# Altium PCB Board3ph.PcbDoc (part 1 of 2)
Units mm, origin at the board's own origin, x right, y up, seen from the top; angles counter-clockwise.
Board outline 64.06 x 79.42 mm, 4 copper layers (Top Layer, Mid Layer, Mid Layer 2, Bottom Layer), stack 0.743 mm thick; 89 components, 80 nets, 350 pads, 102 vias.
Unrouted connection lines stored in the file: 3.
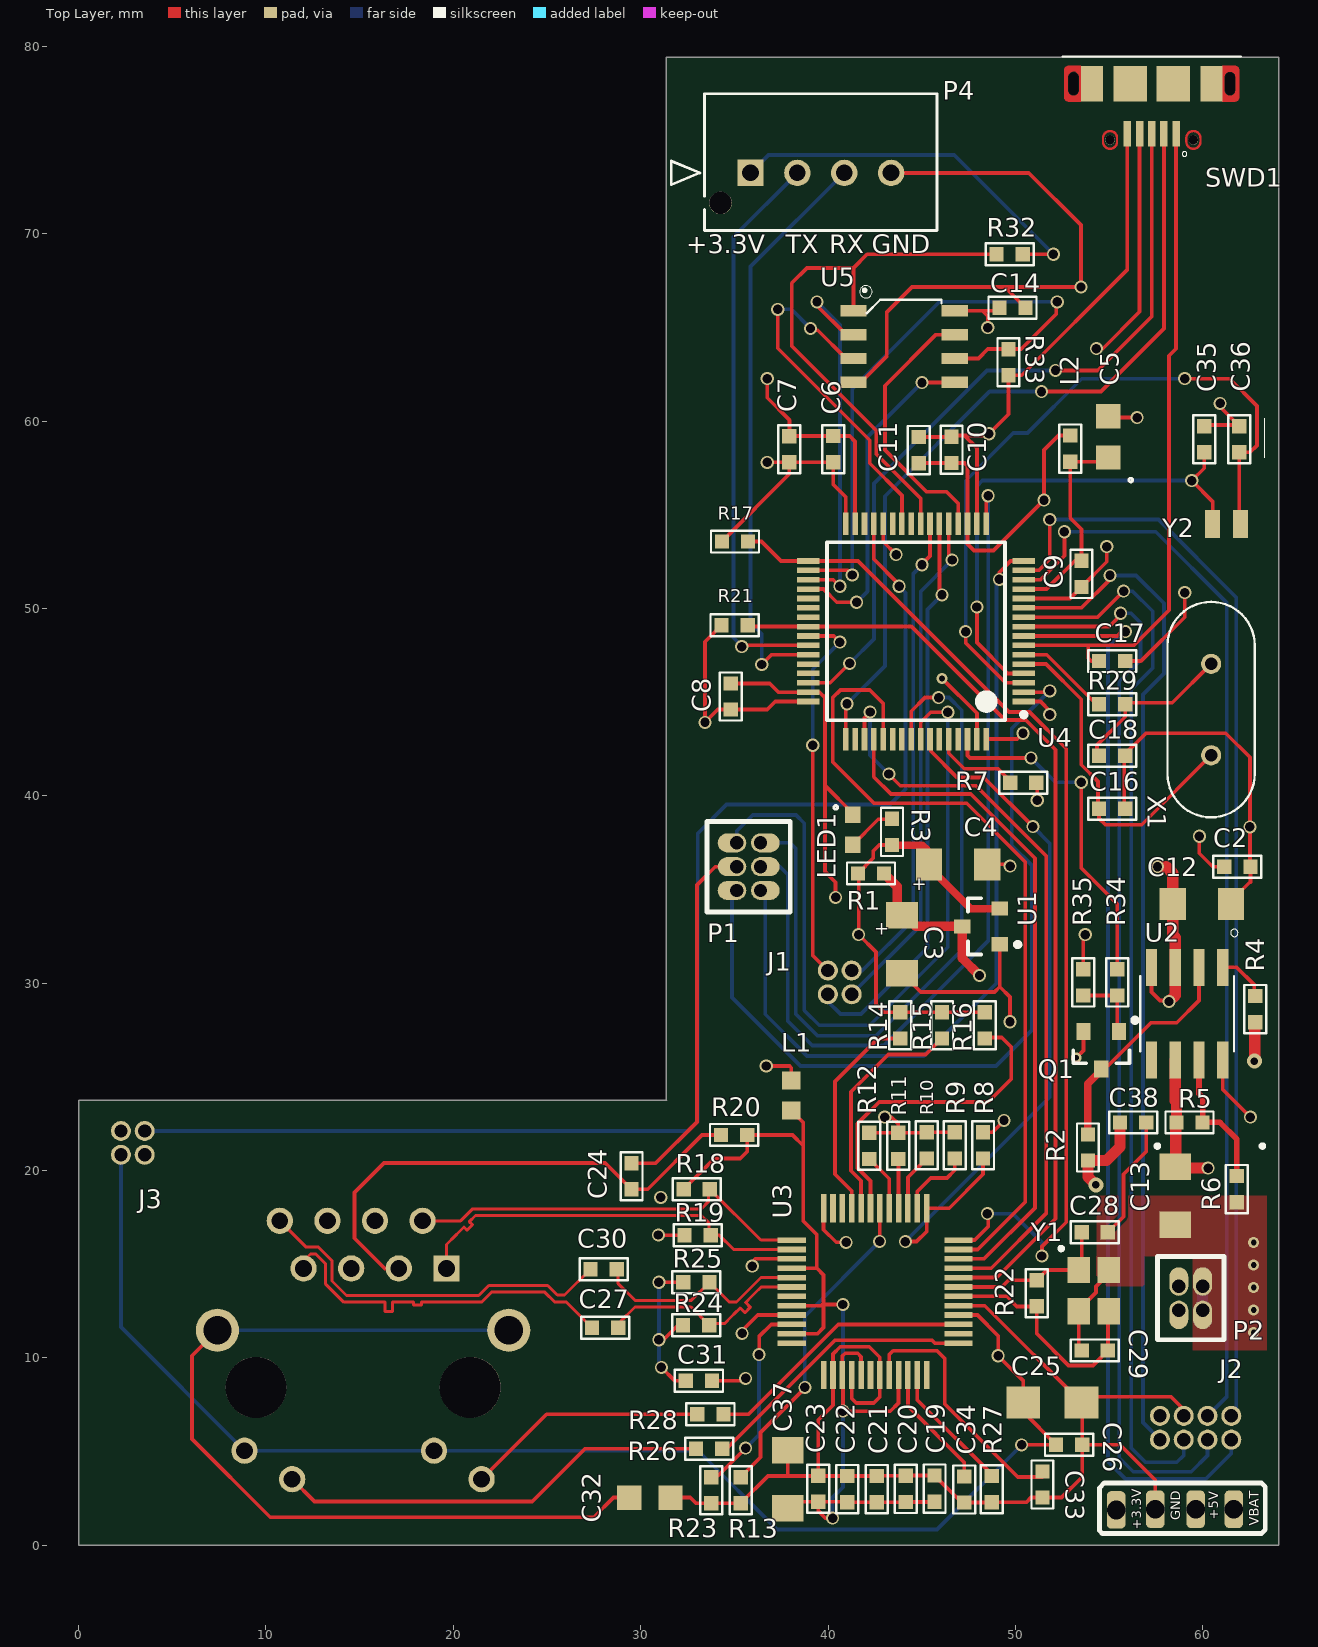
[diagram p0: Top Layer view]
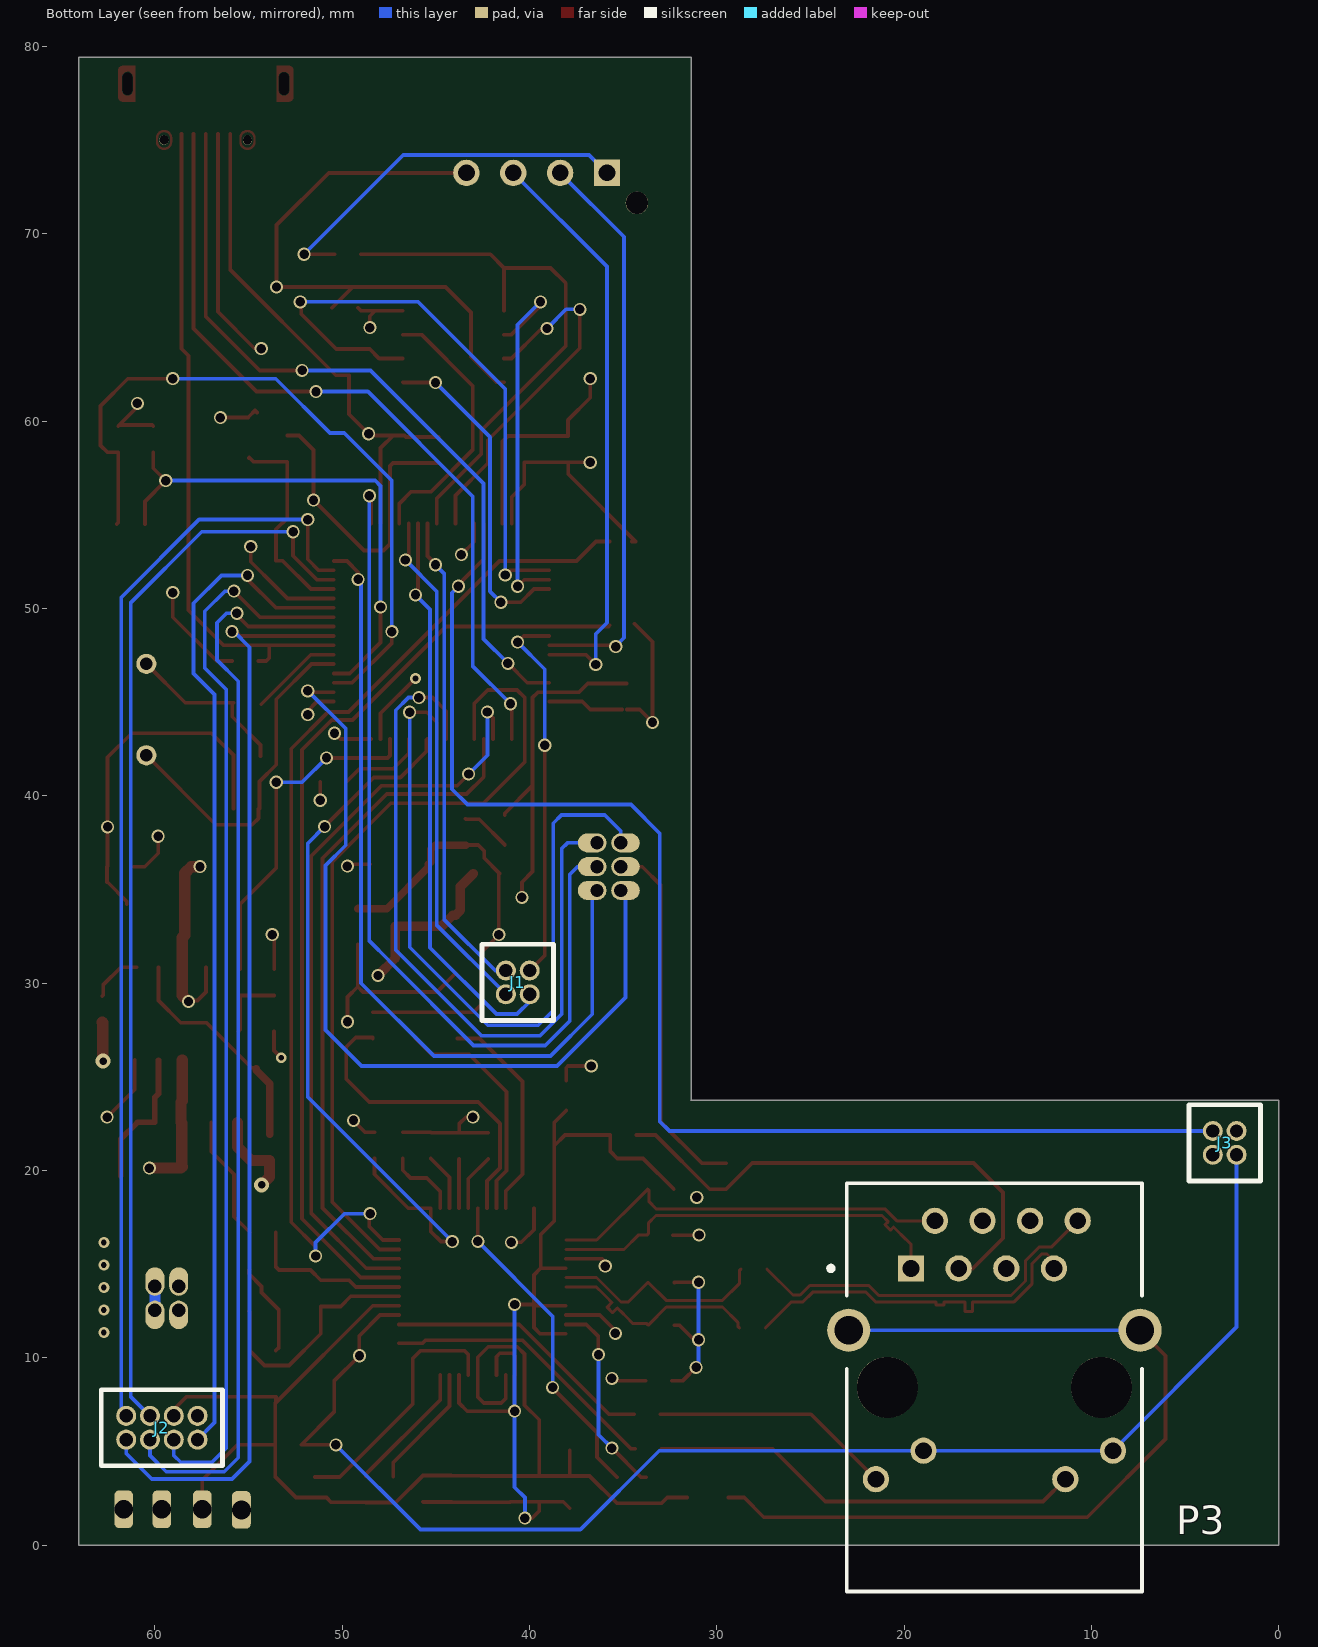
[diagram p1: Bottom Layer view, seen from below]
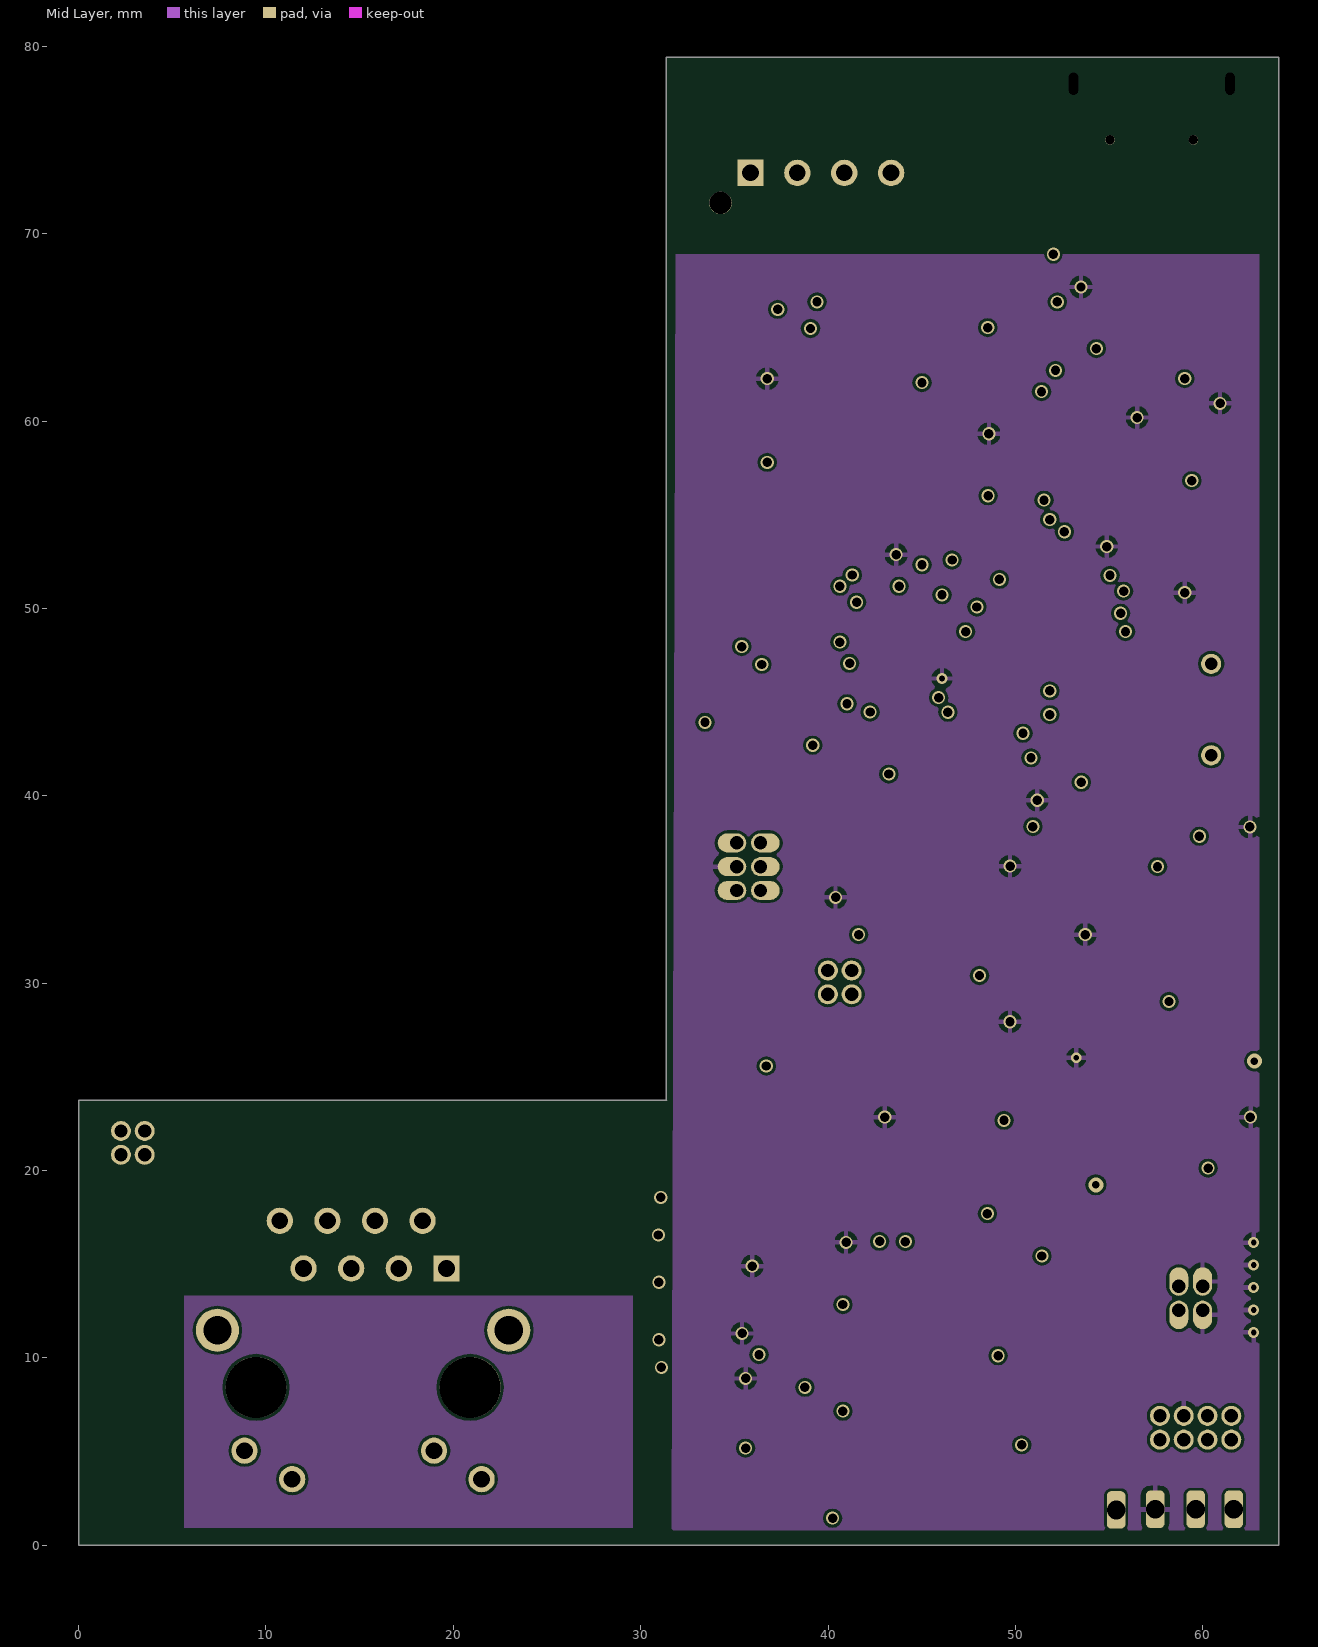
[diagram p2: Mid Layer]
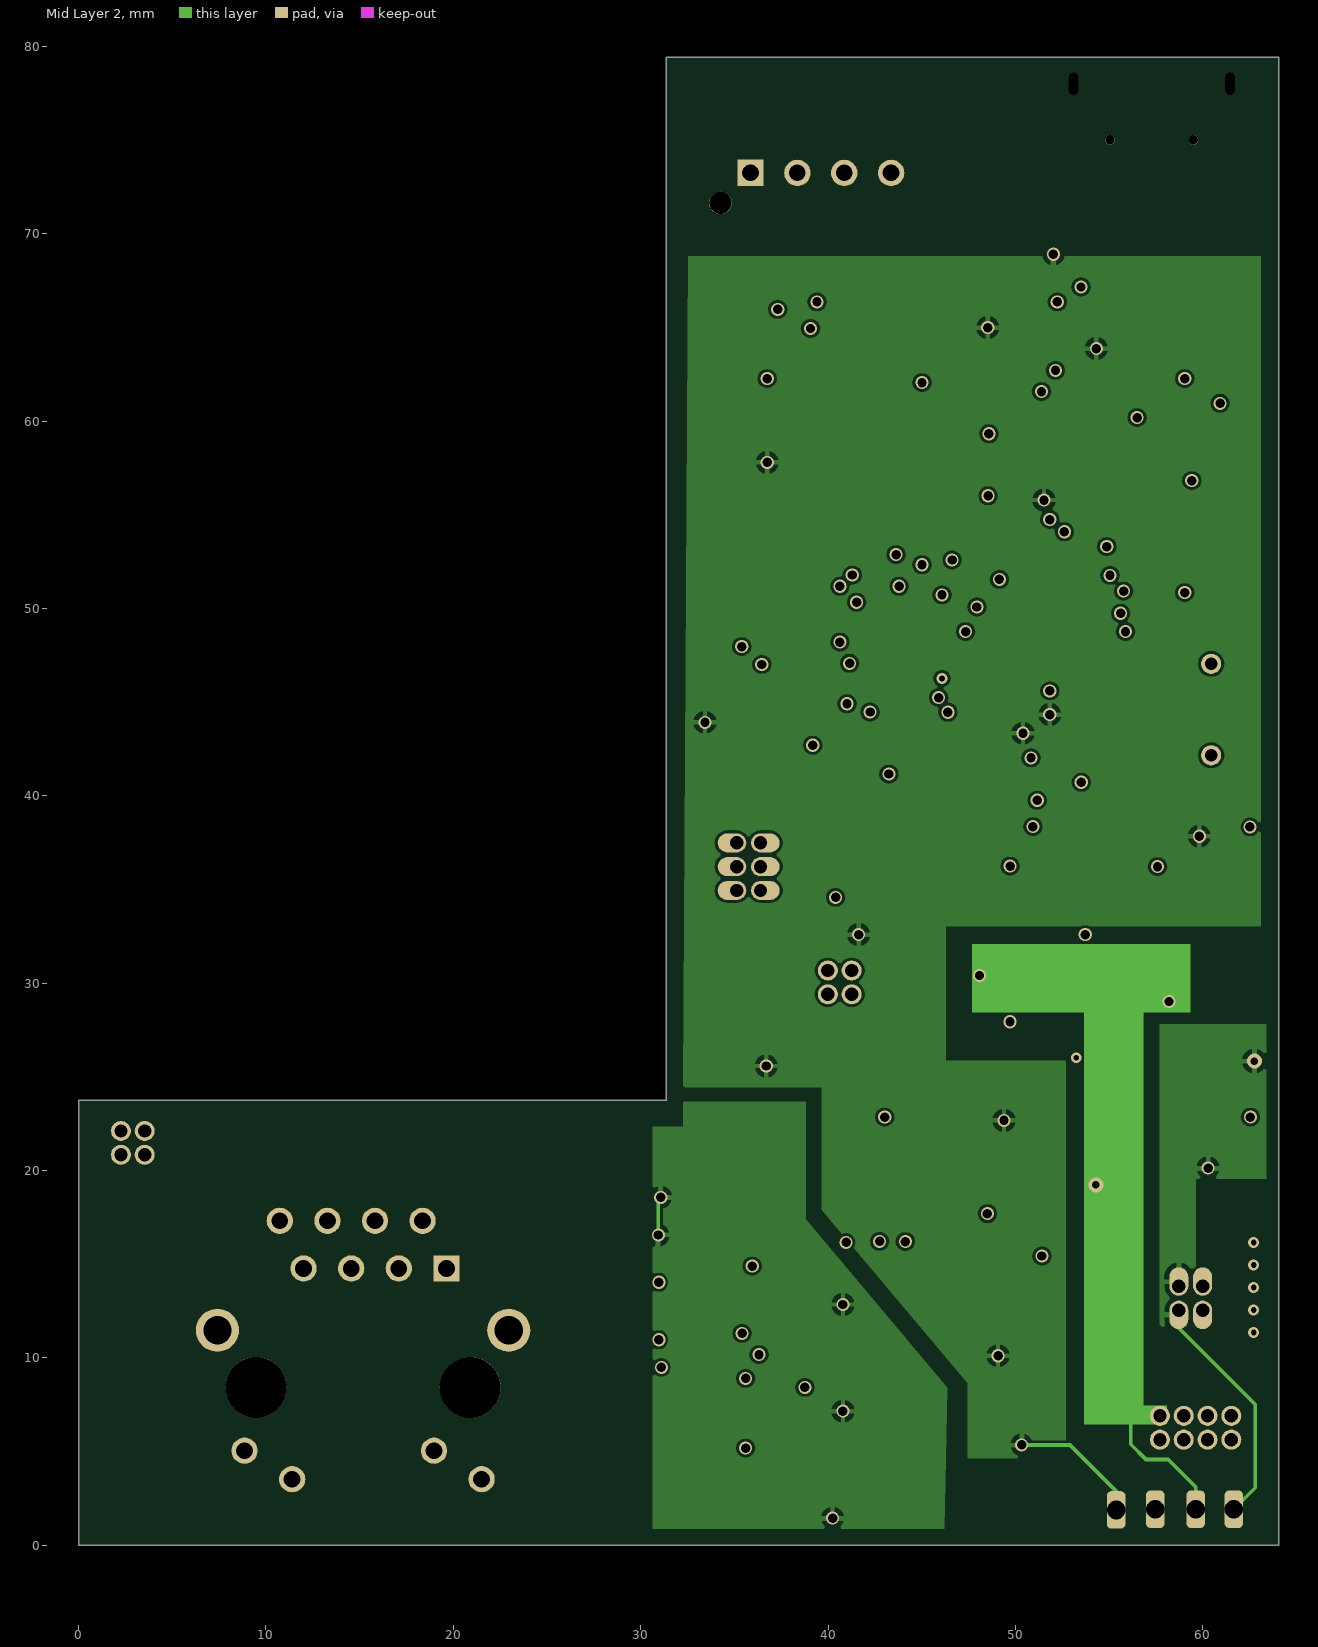
[diagram p3: Mid Layer 2]

## Layer stack, top to bottom
Top Solder: solder mask 0.0102, Solder Resist, Dk 3.5
Top Layer: signal copper 0.018
Dielectric 1: core 0.254, FR-4, Dk 4.2
Mid Layer: signal copper 0.036
Dielectric 3: prepreg 0.127, Dk 4.2
Mid Layer 2: signal copper 0.036
Dielectric 2: core 0.254, Dk 4.2
Bottom Layer: signal copper 0.018
Bottom Solder: solder mask 0.0102, Solder Resist, Dk 3.5

## Board outline
0,0.02 0.02,0 64.06,0 64.06,79.42 31.37,79.42 31.37,23.771 31.38,23.76 0.02,23.76 0,23.74

## Design rules (kind name [scope] priority, off if disabled: settings)
Clearance "Stitching GND" [IsStitchingVia and InNet('GND') vs (IsVia and (Not IsStitchingVia)) Or IsPad] p1: gap=0.127 ignorepadtopadclearanceinfootprint=FALSE
Clearance [All] p2: gap=0.15 ignorepadtopadclearanceinfootprint=FALSE
DiffPairsRouting DiffPair_Diff100DiffPairsRouting [InDifferentialPairClass('Diff100')] p1: maxlimit=3 minlimit=0.2 mostfreqgap=0.254 toplayer_prefgap=0.2 toplayer_minwidth=0.1 toplayer_maxwidth=0.2 toplayer_prefwidth=0.16 midlayer1_minwidth=0.09 midlayer1_maxwidth=0.2 midlayer1_prefwidth=0.09 midlayer2_minwidth=0.09 midlayer2_maxwidth=0.2 midlayer2_prefwidth=0.09 bottomlayer_prefgap=0.2 bottomlayer_minwidth=0.1 bottomlayer_maxwidth=0.2 bottomlayer_prefwidth=0.16 maxuncoupledlength=0
DiffPairsRouting [All] p2: maxlimit=0.254 minlimit=0.254 mostfreqgap=0.254 toplayer_minwidth=0.381 toplayer_maxwidth=0.381 toplayer_prefwidth=0.381 midlayer1_minwidth=0.381 midlayer1_maxwidth=0.381 midlayer1_prefwidth=0.381 midlayer2_minwidth=0.381 midlayer2_maxwidth=0.381 midlayer2_prefwidth=0.381 bottomlayer_minwidth=0.381 bottomlayer_maxwidth=0.381 bottomlayer_prefwidth=0.381 maxuncoupledlength=12.7
MatchedLengths MatchedLengths_Diff100 [InNetClass('Diff100')] p1: tolerance=0.1 checknetsindiffpair=TRUE checkdiffpairvsdiffpair=FALSE checkxsignals=FALSE checkothers=FALSE
MinimumSolderMaskSliver [All] p1: minsoldermaskwidth=0.1
PolygonConnect PolygonConnect_7 [All vs IsNamedPolygon('GND_L01_P020')] p1: connectstyle=Direct reliefconductorwidth=0.254 reliefentries=4 polygonreliefangle="90 Angle" airgapwidth=0.254
PolygonConnect PolygonConnect_6 [All vs IsNamedPolygon('VCC=5V_L01_P019')] p2: connectstyle=Direct reliefconductorwidth=0.254 reliefentries=4 polygonreliefangle="90 Angle" airgapwidth=0.254
PolygonConnect PolygonConnect_5 [All vs IsNamedPolygon('VCC=5V_L01_P018')] p3: connectstyle=Direct reliefconductorwidth=0.254 reliefentries=4 polygonreliefangle="90 Angle" airgapwidth=0.254
PolygonConnect PolygonConnect_4 [All vs IsNamedPolygon('VBAT_L01_P017')] p4: connectstyle=Direct reliefconductorwidth=0.254 reliefentries=4 polygonreliefangle="90 Angle" airgapwidth=0.254
PolygonConnect PolygonConnect_3 [All vs IsNamedPolygon('VBAT_L01_P017')] p5: connectstyle=Direct reliefconductorwidth=0.254 reliefentries=4 polygonreliefangle="90 Angle" airgapwidth=0.254
PolygonConnect PolygonConnect_2 [All vs IsNamedPolygon('VBAT_L01_P017')] p6: thpad.connectstyle=Relief thpad.reliefconductorwidth=0.254 thpad.reliefentries=4 thpad.polygonreliefangle="90 Angle" thpad.airgapwidth=0.254 smdpad.connectstyle=Direct smdpad.reliefconductorwidth=0.254 smdpad.reliefentries=4 smdpad.polygonreliefangle="90 Angle" smdpad.airgapwidth=0.254 via.connectstyle=Relief via.reliefconductorwidth=0.254 via.reliefentries=4 via.polygonreliefangle="90 Angle" via.airgapwidth=0.254
PolygonConnect PolygonConnect_1 [All vs IsNamedPolygon('VBAT_L01_P017')] p7: thpad.connectstyle=Direct thpad.reliefconductorwidth=0.254 thpad.reliefentries=4 thpad.polygonreliefangle="90 Angle" thpad.airgapwidth=0.254 smdpad.connectstyle=Relief smdpad.reliefconductorwidth=0.254 smdpad.reliefentries=4 smdpad.polygonreliefangle="90 Angle" smdpad.airgapwidth=0.254 via.connectstyle=Relief via.reliefconductorwidth=0.254 via.reliefentries=4 via.polygonreliefangle="90 Angle" via.airgapwidth=0.254
PolygonConnect [All] p8: connectstyle=Relief reliefconductorwidth=0.254 reliefentries=4 polygonreliefangle="90 Angle" airgapwidth=0.254
RoutingVias [All] p1: holewidth=0.5 width=0.7 viastyle="Through Hole" minholewidth=0.2 minwidth=0.5 maxholewidth=0.711 maxwidth=1.27
SilkToSilkClearance [All] p1: silktosilkclearance=0.15
SilkToSolderMaskClearance [IsPad] p1: minsilkscreentomaskgap=0.1 clearancetoexposedcopper=TRUE
SolderMaskExpansion [All] p1: expansion=0.102 istentingtop=FALSE
Width [All] p1: maxlimit=1 minlimit=0.15 preferedwidth=0.2
26 further rules are at their usual default settings.

## Classes and differential pairs
differential pair class Diff100: RX RX2 TX
net class Diff100: RX2_N RX2_P RX_N RX_P TX_N TX_P
differential pair RX2: +RX2_P -RX2_N
differential pair TX: +TX_P -TX_N
differential pair RX: +RX_P -RX_N

## Components (designator, comment, footprint, x,y, rotation, side; value= is the part's Value field where it differs from the comment)
C2 "0.1uF/16V" 0603C-TBD 62.537,36.218 r180 top value=100nF
C3 "10uF/10V" "C-3216(TANTAL) - INV" 43.94,32.08 r90 top
C4 "10uF/10V" "C-3216(TANTAL) - INV" 46.94,36.341 r180 top
C5 "1uF/6.3v" "C-2012 - TANT" 54.953,59.15 r90 top value=1uF
C6 "0.1uF/16V" 0603C-TBD 40.28,59.2 r270 top value=100nF
C7 "0.1uF/16V" 0603C-TBD 37.93,59.19 r270 top value=100nF
C8 "0.1uF/16V" 0603C-TBD 34.81,45.997 r270 top value=100nF
C9 "0.1uF/16V" 0603C-TBD 53.52,51.14 r90 top value=100nF
C10 "1uF/6.3v" 0603C-TBD 46.59,57.763 r90 top value=1uF
C11 "0.1uF/16V" 0603C-TBD 44.84,59.15 r270 top value=100nF
C12 "22uF/10V" C-3216(TANTAL)#1 59.944,34.224 r180 top
C13 "22uF/10V" C-3216(TANTAL)#1 58.525,18.66 r90 top
C14 "0.1uF/16V" 0603C-TBD 49.142,66.039 r0 top value=100nF
C16 "20pF" 0603C-TBD 55.857,39.31 r180 top
C17 "0.1uF/16V" 0603C-TBD 55.857,47.19 r180 top value=100nF
C18 "20pF" 0603C-TBD 55.857,42.13 r180 top
C19 "0.1uF/16V" 0603C-TBD 45.68,3.73 r270 top value=100nF
C20 "0.1uF/16V" 0603C-TBD 44.15,3.71 r270 top value=100nF
C21 "0.1uF/16V" 0603C-TBD 42.59,3.703 r270 top value=100nF
C22 "0.1uF/16V" 0603C-TBD 41.02,3.703 r270 top value=100nF
C23 "0.1uF/16V" 0603C-TBD 39.48,3.72 r270 top value=100nF
C24 "0.1uF/16V" 0603C-TBD 29.51,20.397 r270 top value=100nF
C25 "10uF/10V" C-3216(TANTAL)#2 51.97,7.63 r180 top
C26 "10nF" C-1608 53.557,5.37 r180 top
C27 "6.8.nF" C-1608 27.403,11.61 r0 top
C28 "18pF" C-1608 54.927,16.71 r180 top
C29 "18pF" C-1608 53.533,10.4 r0 top
C30 "6.8.nF" C-1608 27.323,14.74 r0 top
C31 "10nF" C-1608 33.807,8.79 r180 top
C32 "1nF/2kV" C-2012 30.49,2.55 r180 top
C33 "4.7uF" 0603C-TBD 51.44,2.55 r90 top
C34 "10nF" C-1608 47.27,2.283 r90 top
C35 "9p" 0603C-TBD 60.069,58.33 r90 top
C36 "9p" 0603C-TBD 61.945,58.33 r90 top
C37 "10uF/10V" C-3216(TANTAL)#1 37.85,3.53 r90 top
C38 "1uF/6.3v" 0603C-TBD 55.58,22.57 r0 top value=1uF
J1 "SFMC-102-X1-XX-D" SFMC-102-X1-XX-D 40.621,30.042 r180 bottom
J2 "SFMC-104-X1-XX-D" SFMC-104-X1-XX-D 59.613,6.276 r0 bottom
J3 "SFMC-102-X1-XX-D" SFMC-102-X1-XX-D 2.897,21.479 r180 bottom
L1 "GLFR1608T1R5M-LR" L-1608 38.03,24.01 r270 top
L2 "30 OHM" 0603C-TBD 52.917,59.23 r270 top
LED1 "POWER" LED-1608 41.31,38.18 r90 top
P1 "Header 3X2" "3x2A 1.27 Double Samtec" 35.76,36.218 r90 top locked
P2 "Header 2X2" "2x2A 1.27 Double Samtec" 59.35,13.19 r0 top locked
P3 "Conn_WIZnet_RB1-125BAG1A_eec" WIZnet_RB1-125BAG1A_0 15.185,8.43 r180 bottom
P4 "2078430004" CON_2078430004_MOL 35.86,73.24 r180 top
Q1 "2N7002" SOT23 54.577,26.423 r270 top
R1 "0R" R-1608 42.988,35.856 r180 top
R2 "22K" 0603C-TBD 53.867,21.93 r270 top
R3 "330R" 0603C-TBD 43.41,37.373 r90 top value=100
R4 "100K" 0603C-TBD 62.8,27.92 r90 top
R5 "402K" 0603C-TBD 59.985,22.57 r180 top
R6 "100K" 0603C-TBD 61.812,18.315 r90 top
R7 "10K" 0603C-TBD 51.11,40.69 r180 top
R8 "10K" 0603C-TBD 48.27,20.65 r90 top
R9 "10K" 0603C-TBD 46.76,20.65 r90 top
R10 "10K" 0603C-TBD 45.27,20.65 r90 top
R11 "10K" 0603C-TBD 43.75,20.62 r90 top
R12 "10K" 0603C-TBD 42.2,20.623 r90 top
R13 "10K" 0603C-TBD 35.331,3.64 r270 top
R14 "10k" 0603C-TBD 43.85,27.05 r90 top
R15 "10k" 0603C-TBD 46.08,27.05 r90 top
R16 "10k" 0603C-TBD 48.36,27.05 r90 top
R17 "10K" 0603C-TBD 35.73,53.57 r180 top
R18 "49R9 1%" R-1608 33.69,19.01 r180 top
R19 "49R9 1%" R-1608 33.737,16.55 r180 top
R20 "10R 1%" R-1608 34.283,21.9 r0 top
R21 "10K" 0603C-TBD 35.707,49.1 r180 top
R22 "1M" R-1608 51.14,14.15 r270 top
R23 "12.4K 1%" R-1608 33.76,2.243 r90 top
R24 "49R9 1%" R-1608 32.26,11.75 r0 top
R25 "49R9 1%" R-1608 32.27,14.04 r0 top
R26 "330R" R-1608 32.953,5.16 r0 top
R27 "10K" 0603C-TBD 48.74,2.303 r90 top
R28 "330R" R-1608 33.023,7 r0 top
R29 "220" 0603C-TBD 54.46,44.89 r0 top
R32 "100k" 0603C-TBD 50.387,68.9 r180 top
R33 "100k" 0603C-TBD 49.623,63.837 r270 top
R34 "100R" 0603C-TBD 55.429,30.74 r270 top
R35 "4K7" 0603C-TBD 53.617,30.74 r270 top
SWD1 "0475890001" MOLEX_0475890001 57.27,78 r180 top
U1 "MCP1700T" SOT23 48.16,33.03 r180 top
U2 "RT9025" SOIC127P600X175-8N 59.16,28.37 r270 top
U3 "W5500" W5500 42.51,13.54 r0 top
U4 "STM32L151RET6" STM-LQFP64_V 44.69,48.78 r180 top
U5 "MCU-M95M02-DRMN6TP(SOIC8)" SOIC8-1.27-5X4MM 44.053,63.975 r270 top
X1 "8MHz" XTAL_HC49P488W43L1150T466H350 60.44,44.6 r270 top
Y1 "25MHz" XTAL3225 54.17,13.59 r270 top
Y2 "CM8V-T1A-32.768KHZ-9PF-20PPM-TA-QC" XTAL_CM8V-T1A-32.768KHZ-9PF-20PPM-TA-QC 61.27,54.51 r0 top

## Footprints (in the part's own frame and the unit in brackets; to place one, negate y for a bottom-side part, rotate by r counter-clockwise, add the part's x,y. Pads: shape width x height; smd on the part's side, far side on the other; paste and mask are expansions set on the pad)
"2x2A 1.27 Double Samtec" [mil]
  oval 40x60 hole 28 copper offset 0,-10 mask+2: 1(-25,-25) 3(25,-25)
  oval 40x60 hole 28 copper offset 0,10 mask+2: 2(-25,25) 4(25,25)
  silkscreen extent -70,-87 70,88, body extent -50,-62 50,73, height 290
"3x2A 1.27 Double Samtec" [mil]
  oval 40x60 hole 28 copper offset 0,-10 mask+2: 1(-50,-25) 3(0,-25) 5(50,-25)
  oval 40x60 hole 28 copper offset 0,10 mask+2: 2(-50,25) 4(0,25) 6(50,25)
  silkscreen extent -95,-88 95,87, body extent -75,-62 25,73, height 290
0603C-TBD [mil] "CAPACITOR 0603 TBD"
  rect 30x30 smd: 1(0,0) 2(55,0)
  silkscreen extent -23,-23 78,23, body extent -4,-15 59,15, height 19
C-1608 [mil] "C-1608"
  rect 30x30 smd: 1(0,0) 2(55,0)
  silkscreen extent -23,-23 78,23, body extent -4,-15 59,15, height 19
C-2012 [mm] "C-2012"
  rect 1.3x1.3 smd: 1(-1.1,0) 2(1.1,0)
  body extent -1.05,-0.6 1.05,0.5, height 1.33
"C-2012 - TANT" [mm] "Condensateurs au tantale Moulé 1µF 16V 0805 (2012 métrique)"
  rect 1.3x1.3 smd: 1(-1.1,0) 2(1.1,0)
  silkscreen extent -2.4,-1.3 -2.2,-1.1, body extent -1,-0.62 1,0.63, height 1.2
C-3216(TANTAL)#1 [mm] "C-3216(TANTAL)"
  rect 1.4x1.7 smd: 1(-1.55,0) 2(1.55,0)
  body extent -1.7,-0.9 1.7,0.9, height 1.8
C-3216(TANTAL)#2 [mm] "C-3216(TANTAL)"
  rect 1.8x1.7 smd: 1(1.55,0) 2(-1.55,0)
  body extent -1.5,-0.95 1.9,0.85, height 1.8
"C-3216(TANTAL) - INV" [mm] "C-3216(TANTAL)"
  rect 1.4x1.7 smd: 1(1.55,0) 2(-1.55,0)
  body extent -1.7,-0.9 1.7,0.9, height 1.8
CON_2078430004_MOL [mm]
  rect 1.408x1.408 hole 0.889 mask+0.076: 1(0,0)
  round 1.408 hole 0.889 mask+0.076: 2(-2.5,0) 3(-5,0) 4(-7.5,0)
  round 1.2 hole 1.194 unplated mask+0.076: 5(1.6,1.6)
  silkscreen extent -9.95,-4.22 4.23,3.08, body extent -10,-4.5 2.41,3.09, height 12.65
L-1608 [mm] "L-1608"
  rect 0.95x1 smd: 1(-0.8,0) 2(0.8,0)
  body extent -0.87,-0.47 0.88,0.48, height 1
LED-1608 [mm] "LED-1608"
  rect 0.89x0.82 smd: 1(-0.8,0) 2(0.8,0)
  silkscreen extent 1.1,0.8 1.3,1, body extent -0.93,-0.33 0.73,0.4, height 0.68
MOLEX_0475890001 [mm]
  rect 0.4x1.35 smd: 1(-1.3,2.675) 2(-0.65,2.675) 3(0,2.675) 4(0.65,2.675) 5(1.3,2.675)
  rect 1.175x1.9 smd: 6(-3.187,0) 9(3.187,0)
  rect 1.8x1.9 smd: 7(-1.15,0) 8(1.15,0)
  rect 0.4x1 hole 1.2 slot 0.5 at 0 deg unplated: None(-4.183,0) None(4.175,0)
  round 0.5 hole 0.5 unplated: None(-2.225,3) None(2.225,3)
  Top Layer region: 3.875,0.95 3.775,0.95 3.775,-0.95 3.875,-0.95
  Top Layer region: 183 vertices and 0 holes, not listed, extent 3.875,-0.95 4.675,0.95
  Top Layer region: -3.875,0.95 -3.775,0.95 -3.775,-0.95 -3.875,-0.95
  Top Layer region: 2.236,2.475 2.258,2.476 2.28,2.478 2.302,2.482 2.324,2.487 2.346,2.492 2.367,2.499 2.388,2.507 2.408,2.516 2.428,2.526 2.447,2.538 2.466,2.55 2.484,2.563 2.501,2.577 2.518,2.592 2.533,2.607 2.548,2.624 2.562,2.641 2.575,2.659 2.587,2.678 2.599,2.697 2.609,2.717 2.618,2.737 2.626,2.758 2.633,2.779 2.638,2.801 2.643,2.823 2.647,2.845 2.649,2.867 2.65,2.889 2.65,3 2.55,3 2.55,2.891 2.549,2.874 2.547,2.858 2.545,2.841 2.541,2.824 2.537,2.808 2.531,2.791 2.525,2.776 2.518,2.76 2.511,2.745 2.502,2.73 2.493,2.716 2.483,2.702 2.472,2.689 2.461,2.676 2.449,2.664 2.436,2.653 2.423,2.642 2.409,2.632 2.395,2.623 2.38,2.614 2.365,2.607 2.349,2.6 2.334,2.594 2.317,2.588 2.301,2.584 2.284,2.58 2.267,2.578 2.251,2.576 2.234,2.575 2.216,2.575 2.199,2.576 2.183,2.578 2.166,2.58 2.149,2.584 2.133,2.588 2.116,2.594 2.101,2.6 2.085,2.607 2.07,2.614 2.055,2.623 2.041,2.632 2.027,2.642 2.014,2.653 2.001,2.664 1.989,2.676 1.978,2.689 1.967,2.702 1.957,2.716 1.948,2.73 1.939,2.745 1.932,2.76 1.925,2.776 1.919,2.791 1.913,2.808 1.909,2.824 1.905,2.841 1.903,2.858 1.901,2.874 1.9,2.891 1.9,3 1.8,3 1.8,2.889 1.801,2.867 1.803,2.845 1.807,2.823 1.812,2.801 1.817,2.779 1.824,2.758 1.832,2.737 1.841,2.717 1.851,2.697 1.863,2.678 1.875,2.659 1.888,2.641 1.902,2.624 1.917,2.607 1.932,2.592 1.949,2.577 1.966,2.563 1.984,2.55 2.003,2.538 2.022,2.526 2.042,2.516 2.062,2.507 2.083,2.499 2.104,2.492 2.126,2.487 2.148,2.482 2.17,2.478 2.192,2.476 2.214,2.475
  Top Layer region: 2.234,3.425 2.251,3.424 2.267,3.422 2.284,3.42 2.301,3.416 2.317,3.412 2.334,3.406 2.349,3.4 2.365,3.393 2.38,3.386 2.395,3.377 2.409,3.368 2.423,3.358 2.436,3.347 2.449,3.336 2.461,3.324 2.472,3.311 2.483,3.298 2.493,3.284 2.502,3.27 2.511,3.255 2.518,3.24 2.525,3.224 2.531,3.209 2.537,3.192 2.541,3.176 2.545,3.159 2.547,3.142 2.549,3.126 2.55,3.109 2.55,3 2.65,3 2.65,3.111 2.649,3.133 2.647,3.155 2.643,3.177 2.638,3.199 2.633,3.221 2.626,3.242 2.618,3.263 2.609,3.283 2.599,3.303 2.588,3.322 2.575,3.341 2.562,3.359 2.548,3.376 2.533,3.393 2.518,3.408 2.501,3.423 2.484,3.437 2.466,3.45 2.447,3.462 2.428,3.474 2.408,3.484 2.388,3.493 2.367,3.501 2.346,3.508 2.324,3.513 2.302,3.518 2.281,3.522 2.258,3.524 2.236,3.525 2.214,3.525 2.192,3.524 2.17,3.522 2.148,3.518 2.126,3.513 2.104,3.508 2.083,3.501 2.062,3.493 2.042,3.484 2.022,3.474 2.003,3.463 1.984,3.45 1.966,3.437 1.949,3.423 1.932,3.408 1.917,3.393 1.902,3.376 1.888,3.359 1.875,3.341 1.863,3.322 1.851,3.303 1.841,3.283 1.832,3.263 1.824,3.242 1.817,3.221 1.812,3.199 1.807,3.177 1.803,3.156 1.801,3.133 1.8,3.111 1.8,3 1.9,3 1.9,3.109 1.901,3.126 1.903,3.142 1.905,3.159 1.909,3.176 1.913,3.192 1.919,3.209 1.925,3.224 1.932,3.24 1.939,3.255 1.948,3.27 1.957,3.284 1.967,3.298 1.978,3.311 1.989,3.324 2.001,3.336 2.014,3.347 2.027,3.358 2.041,3.368 2.055,3.377 2.07,3.386 2.085,3.393 2.101,3.4 2.116,3.406 2.133,3.412 2.149,3.416 2.166,3.42 2.183,3.422 2.199,3.424 2.216,3.425
  Top Layer region: -2.214,2.475 -2.192,2.476 -2.17,2.478 -2.148,2.482 -2.126,2.487 -2.104,2.492 -2.083,2.499 -2.062,2.507 -2.042,2.516 -2.022,2.526 -2.003,2.538 -1.984,2.55 -1.966,2.563 -1.949,2.577 -1.932,2.592 -1.917,2.607 -1.902,2.624 -1.888,2.641 -1.875,2.659 -1.863,2.678 -1.851,2.697 -1.841,2.717 -1.832,2.737 -1.824,2.758 -1.817,2.779 -1.812,2.801 -1.807,2.823 -1.803,2.845 -1.801,2.867 -1.8,2.889 -1.8,3 -1.9,3 -1.9,2.891 -1.901,2.874 -1.903,2.858 -1.905,2.841 -1.909,2.824 -1.913,2.808 -1.919,2.791 -1.925,2.776 -1.932,2.76 -1.939,2.745 -1.948,2.73 -1.957,2.716 -1.967,2.702 -1.978,2.689 -1.989,2.676 -2.001,2.664 -2.014,2.653 -2.027,2.642 -2.041,2.632 -2.055,2.623 -2.07,2.614 -2.085,2.607 -2.101,2.6 -2.116,2.594 -2.133,2.588 -2.149,2.584 -2.166,2.58 -2.183,2.578 -2.199,2.576 -2.216,2.575 -2.234,2.575 -2.251,2.576 -2.267,2.578 -2.284,2.58 -2.301,2.584 -2.317,2.588 -2.334,2.594 -2.349,2.6 -2.365,2.607 -2.38,2.614 -2.395,2.623 -2.409,2.632 -2.423,2.642 -2.436,2.653 -2.449,2.664 -2.461,2.676 -2.472,2.689 -2.483,2.702 -2.493,2.716 -2.502,2.73 -2.511,2.745 -2.518,2.76 -2.525,2.776 -2.531,2.791 -2.537,2.808 -2.541,2.824 -2.545,2.841 -2.547,2.858 -2.549,2.874 -2.55,2.891 -2.55,3 -2.65,3 -2.65,2.889 -2.649,2.867 -2.647,2.845 -2.643,2.823 -2.638,2.801 -2.633,2.779 -2.626,2.758 -2.618,2.737 -2.609,2.717 -2.599,2.697 -2.588,2.678 -2.575,2.659 -2.562,2.641 -2.548,2.624 -2.533,2.607 -2.518,2.592 -2.501,2.577 -2.484,2.563 -2.466,2.55 -2.447,2.538 -2.428,2.526 -2.408,2.516 -2.388,2.507 -2.367,2.499 -2.346,2.492 -2.324,2.487 -2.302,2.482 -2.281,2.478 -2.258,2.476 -2.236,2.475
  Top Layer region: -2.216,3.425 -2.199,3.424 -2.183,3.422 -2.166,3.42 -2.149,3.416 -2.133,3.412 -2.116,3.406 -2.101,3.4 -2.085,3.393 -2.07,3.386 -2.055,3.377 -2.041,3.368 -2.027,3.358 -2.014,3.347 -2.001,3.336 -1.989,3.324 -1.978,3.311 -1.967,3.298 -1.957,3.284 -1.948,3.27 -1.939,3.255 -1.932,3.24 -1.925,3.224 -1.919,3.209 -1.913,3.192 -1.909,3.176 -1.905,3.159 -1.903,3.142 -1.901,3.126 -1.9,3.109 -1.9,3 -1.8,3 -1.8,3.111 -1.801,3.133 -1.803,3.155 -1.807,3.177 -1.812,3.199 -1.817,3.221 -1.824,3.242 -1.832,3.263 -1.841,3.283 -1.851,3.303 -1.863,3.322 -1.875,3.341 -1.888,3.359 -1.902,3.376 -1.917,3.393 -1.932,3.408 -1.949,3.423 -1.966,3.437 -1.984,3.45 -2.003,3.462 -2.022,3.474 -2.042,3.484 -2.062,3.493 -2.083,3.501 -2.104,3.508 -2.126,3.513 -2.148,3.518 -2.17,3.522 -2.192,3.524 -2.214,3.525 -2.236,3.525 -2.258,3.524 -2.28,3.522 -2.302,3.518 -2.324,3.513 -2.346,3.508 -2.367,3.501 -2.388,3.493 -2.408,3.484 -2.428,3.474 -2.447,3.463 -2.466,3.45 -2.484,3.437 -2.501,3.423 -2.518,3.408 -2.533,3.393 -2.548,3.376 -2.562,3.359 -2.575,3.341 -2.587,3.322 -2.599,3.303 -2.609,3.283 -2.618,3.263 -2.626,3.242 -2.633,3.221 -2.638,3.199 -2.643,3.177 -2.647,3.156 -2.649,3.133 -2.65,3.111 -2.65,3 -2.55,3 -2.55,3.109 -2.549,3.126 -2.547,3.142 -2.545,3.159 -2.541,3.176 -2.537,3.192 -2.531,3.209 -2.525,3.224 -2.518,3.24 -2.511,3.255 -2.502,3.27 -2.493,3.284 -2.483,3.298 -2.472,3.311 -2.461,3.324 -2.449,3.336 -2.436,3.347 -2.423,3.358 -2.409,3.368 -2.395,3.377 -2.38,3.386 -2.365,3.393 -2.349,3.4 -2.334,3.406 -2.317,3.412 -2.301,3.416 -2.284,3.42 -2.267,3.422 -2.251,3.424 -2.234,3.425
  Top Layer region: 183 vertices and 0 holes, not listed, extent -4.675,-0.95 -3.875,0.95
  silkscreen extent -4.75,-1.45 4.75,3.88, body extent -4.32,-2.79 4.32,3.1, height 2.56
R-1608 [mil] "R-1608"
  rect 30x30 smd: 1(0,0) 2(55,0)
  silkscreen extent -23,-23 78,23, body extent -4,-15 59,15, height 19
SFMC-102-X1-XX-D [mil] "Pitch: .050\" (1.27 mm)"
  round 42 hole 28 mask+3: 1(25,-25) 2(25,25) 3(-25,-25) 4(-25,25)
  silkscreen extent -75,-80 75,80
SFMC-104-X1-XX-D [mil] "Pitch: .050\" (1.27 mm)"
  round 42 hole 28 mask+3: 1(75,-25) 2(75,25) 3(25,-25) 4(25,25) 5(-25,-25) 6(-25,25) 7(-75,-25) 8(-75,25)
  silkscreen extent -128,-80 128,80
SOIC8-1.27-5X4MM [mm] "M95M04-DRMN6TP EEPROM"
  rect 0.6x1.4 smd: 1(-1.905,-2.7) 2(-0.635,-2.7) 3(0.635,-2.7) 4(1.905,-2.7) 5(1.905,2.7) 6(0.635,2.7) 7(-0.635,2.7) 8(-1.905,2.7)
  silkscreen extent -3.25,-2.36 -1.77,2, body extent -2.5,-3 2.5,3.2, height 1.75
SOIC127P600X175-8N [mm]
  rect 1.97x0.6 smd: 1(-2.475,1.905) 2(-2.475,0.635) 3(-2.475,-0.635) 4(-2.475,-1.905) 5(2.475,-1.905) 6(2.475,-0.635) 7(2.475,0.635) 8(2.475,1.905)
  silkscreen extent -4.51,-2.5 2,2.71, body extent -3.2,-2.5 3,2.5, height 1.75
SOT23 [mm]
  rect 0.9x0.762 smd: 1(-1,0.95) 2(-1,-0.95) 3(1,0)
  silkscreen extent -1.72,-1.5 0.7,1.92, body extent -0.7,-1.52 0.7,1.52, height 1.11
STM-LQFP64_V [mm] "Thin QFP, 64-Leads, Body 10x10mm, Pitch 0.5mm, ST Recommended"
  rect 1.2x0.3 smd: 1(-5.75,3.75) 2(-5.75,3.25) 3(-5.75,2.75) 4(-5.75,2.25) 5(-5.75,1.75) 6(-5.75,1.25) 7(-5.75,0.75) 8(-5.75,0.25) 9(-5.75,-0.25) 10(-5.75,-0.75) 11(-5.75,-1.25) 12(-5.75,-1.75) 13(-5.75,-2.25) 14(-5.75,-2.75) 15(-5.75,-3.25) 16(-5.75,-3.75) 33(5.75,-3.75) 34(5.75,-3.25) 35(5.75,-2.75) 36(5.75,-2.25) 37(5.75,-1.75) 38(5.75,-1.25) 39(5.75,-0.75) 40(5.75,-0.25) 41(5.75,0.25) 42(5.75,0.75) 43(5.75,1.25) 44(5.75,1.75) 45(5.75,2.25) 46(5.75,2.75) 47(5.75,3.25) 48(5.75,3.75)
  rect 0.3x1.2 smd: 17(-3.75,-5.75) 18(-3.25,-5.75) 19(-2.75,-5.75) 20(-2.25,-5.75) 21(-1.75,-5.75) 22(-1.25,-5.75) 23(-0.75,-5.75) 24(-0.25,-5.75) 25(0.25,-5.75) 26(0.75,-5.75) 27(1.25,-5.75) 28(1.75,-5.75) 29(2.25,-5.75) 30(2.75,-5.75) 31(3.25,-5.75) 32(3.75,-5.75) 49(3.75,5.75) 50(3.25,5.75) 51(2.75,5.75) 52(2.25,5.75) 53(1.75,5.75) 54(1.25,5.75) 55(0.75,5.75) 56(0.25,5.75) 57(-0.25,5.75) 58(-0.75,5.75) 59(-1.25,5.75) 60(-1.75,5.75) 61(-2.25,5.75) 62(-2.75,5.75) 63(-3.25,5.75) 64(-3.75,5.75)
  silkscreen extent -5.87,-4.75 4.75,4.75, body extent -5,-5 5,5, height 1.6
W5500 [mm] "W5500"
  rect 1.5x0.3 smd: 1(-4.45,2.75) 2(-4.45,2.25) 3(-4.45,1.75) 4(-4.45,1.25) 5(-4.45,0.75) 6(-4.45,0.25) 7(-4.45,-0.25) 8(-4.45,-0.75) 9(-4.45,-1.25) 10(-4.45,-1.75) 11(-4.45,-2.25) 12(-4.45,-2.75) 25(4.45,-2.75) 26(4.45,-2.25) 27(4.45,-1.75) 28(4.45,-1.25) 29(4.45,-0.75) 30(4.45,-0.25) 31(4.45,0.25) 32(4.45,0.75) 33(4.45,1.25) 34(4.45,1.75) 35(4.45,2.25) 36(4.45,2.75)
  rect 0.3x1.5 smd: 13(-2.75,-4.45) 14(-2.25,-4.45) 15(-1.75,-4.45) 16(-1.25,-4.45) 17(-0.75,-4.45) 18(-0.25,-4.45) 19(0.25,-4.45) 20(0.75,-4.45) 21(1.25,-4.45) 22(1.75,-4.45) 23(2.25,-4.45) 24(2.75,-4.45) 37(2.75,4.45) 38(2.25,4.45) 39(1.75,4.45) 40(1.25,4.45) 41(0.75,4.45) 42(0.25,4.45) 43(-0.25,4.45) 44(-0.75,4.45) 45(-1.25,4.45) 46(-1.75,4.45) 47(-2.25,4.45) 48(-2.75,4.45)
  body extent -4.5,-4.5 4.5,4.5, height 1.55
WIZnet_RB1-125BAG1A_0 [mm]
  round 2.3 hole 1.5 paste-2539.97 mask+0: 1(-7.775,3.05) 2(7.775,3.05)
  round 1.4 hole 0.9 paste-2539.97 mask+0: L1(6.325,-3.38) L2(3.785,-4.9) L3(-3.785,-3.38) L4(-6.325,-4.9) R2(-3.175,8.89) R3(-1.905,6.35) R4(-0.635,8.89) R5(0.635,6.35) R6(1.905,8.89) R7(3.175,6.35) R8(4.445,8.89)
  rect 1.4x1.4 hole 0.9 paste-2539.97 mask+0: R1(-4.445,6.35)
  round 3.25 hole 3.25 unplated paste-2539.97 mask+0: ""(-5.715,0) ""(5.715,0)
  silkscreen extent -8.85,-10.89 7.88,10.89, body extent -9.01,-10.7 9.01,10.6, height 14.36
XTAL3225 [mil] "XTAL3225"
  rect 55.12x47.24 smd: 1(-43.31,-31.5) 2(43.31,-31.5) 3(43.31,31.5) 4(-43.31,31.5)
  body extent -45,-41 57,41, height 22
XTAL_CM8V-T1A-32.768KHZ-9PF-20PPM-TA-QC [mm]
  rect 0.8x1.5 smd: 1(-0.75,0) 2(0.75,0)
  body extent -1,-0.6 1,0.6, height 0.35
XTAL_HC49P488W43L1150T466H350 [mm]
  round 1.08 hole 0.68: 1(-2.44,0) 2(2.44,0)
  silkscreen extent -5.75,-2.33 5.75,2.33, body extent -5.49,-2.3 5.69,2.37, height 3.63

## Part data
C2 C6 C7 C8 C9 C11 C14 C17 C19 C20 C21 C22 C23 C24: library part Cap, "CAPACITOR 0603 CERAMIC", Capacitance=100nF, Case Code (Metric)=1608, Manufacturer=Samsung, Manufacturer Part Number=CL10F104ZO8NNNC, Supplier Part Number 1=1276-1258-1-ND, Voltage Rating=16V, Category="Ceramic Capacitors", Revision="July-2002: Re-released for DXP Platform.", Supplier 1=Digi-Key
C3 C4: library part C-3216(TANTAL), "CAP TANT 10UF 10% 10V 1206  (3216)", Capacitance=10uF, Case Code (Metric)=3216, Manufacturer="Kyocera AVX", Manufacturer Part Number=TAJA106K006RNJ, Supplier Part Number 1=478-1653-1-ND, Tolerance=20%, Voltage=6.3V, Category="Tantalum Capacitors", ComponentLink1Description=supplier, ComponentLink1URL=https://www.digikey.com/product-detail/en/avx-corporation/TAJA106K010RNJ/478-1654-1-ND/564686, Supplier 1=Digi-Key
C5: library part "Cap Pol1", "Polarized Capacitor  1uF/16V TANTAL 0805", Case Code (Metric)=2012, Manufacturer="Kyocera AVX", Manufacturer Part Number=F921C105MPA, Supplier Part Number 1=478-8126-1-ND, Tolerance=20%, Voltage Rating=16V, Category="Tantalum Capacitors", Published=8-Jun-2000, Publisher="Altium Limited", Revision="July-2002: Re-released for DXP Platform.", Supplier 1=Digi-Key, Supplier Unit Price 1=$0.09899
C10 C38: library part CAP, "Capacitor 1uF 6.3V X5R 10% SMD 0603", Case Code (Metric)=1608, Dielectric=X5R, Manufacturer=Samsung, Manufacturer Part Number=CL10A105KQ8NNNC, Supplier Part Number 1=1276-1036-1-ND, Tolerance=10%, Voltage Rating=6.3V, Category="Ceramic Capacitors", Supplier 1=Digi-Key, Supplier Unit Price 1=$0.00877
C12 C13: library part 0805C-18PF-50V-C0G-JOH, "Tantalum Capacitors - Solid SMD 10V 22uF 20%  3216 -1206", Case Code (Metric)=3216, Leakage Current=2.2uA, Manufacturer="Kyocera AVX", Manufacturer Part Number=TAJA226M010RNJ, Supplier Part Number 1=478-5798-1-ND, Category="Tantalum Capacitors", Supplier 1=Digi-Key
C16 C18: library part CAP, "Capacitor 20p 50v 0603", Case Code (Metric)=1608, Manufacturer=Samsung, Manufacturer Part Number=CL10C200JB8NNNC, Supplier Part Number 1=1276-1187-1-ND, Temperature Coefficient=300ppm/°C, Tolerance=5%, Voltage=50V, Capacitance=20pF, Category="Ceramic Capacitors", Supplier 1=Digi-Key, Supplier Unit Price 1=$0.0134
C25 C37: library part C-3216(TANTAL), "CAP TANT 10UF 10% 10V 1206  (3216)", Capacitance=10uF, Case Code (Metric)=3216, ESR (Equivalent Series Resistance)=3R, Manufacturer="Kyocera AVX", Manufacturer Part Number=TAJA106K010RNJ, Supplier Part Number 1=478-1654-1-ND, Tolerance=10%, Voltage=10V, Category="Tantalum Capacitors", ComponentLink1Description=supplier, ComponentLink1URL=https://www.digikey.com/product-detail/en/avx-corporation/TAJA106K010RNJ/478-1654-1-ND/564686, Supplier 1=Digi-Key
C26 C31 C34: library part C-1608, "Multilayer Ceramic Capacitors MLCC - SMD/SMT 16V 0.01uF 0603 X8R 5%", Manufacturer=KEMET, Manufacturer Part Number=C0603X103J4HACTU, Supplier Part Number 1=80-C0603X103J4HACTU, Supplier 1=Mouser, Supplier Unit Price 1=$0.024
C27 C30: library part C-1608, "6800pF ±10% 200V Ceramic Capacitor X7R 0603 (1608 Metric)", Capacitance=6.8nF, Case Code (Metric)=1608, Manufacturer=KEMET, Manufacturer Part Number=C0603C682K2RECAUTO, Supplier Part Number 1=399-14765-1-ND, Tolerance=10%, Category="Ceramic Capacitors", Supplier 1=Digi-Key, Supplier Unit Price 1=$0.05209
C28 C29: library part C-1608, "18pF ±5% 50V Ceramic Capacitor C0G, NP0 0603 (1608 Metric)", Case Code (Metric)=1608, Manufacturer=Samsung, Manufacturer Part Number=CL10C180JB8NNNC, Supplier Part Number 1=1276-1089-1-ND, Temperature Coefficient=300ppm/°C, Tolerance=5%, Capacitance=18pF, Category="Ceramic Capacitors", Mount="Surface Mount", Supplier 1=Digi-Key, Supplier Unit Price 1=$0.01549
C32: library part C-4520, "1000pF ±10% 1000V (1kV) Ceramic Capacitor X7R 0805 (2012 Metric)", Capacitance=1nF, Case/Package=0805, Manufacturer=KEMET, Manufacturer Part Number=C0805C102KDRACAUTO, Supplier Part Number 1=399-16643-1-ND, Tolerance=10%, Voltage Rating=1kV, Category=Capacitors, Supplier 1=Digi-Key, Supplier Unit Price 1=$0.13364
C33: library part C-2012, "CAP CER 4,7UF 10V X5R 0603", Case Code (Imperial)=0603, Dielectric=X5R, Tolerance=10%, Voltage Rating=25V, Capacitance=4.7uF, Category="Ceramic Capacitors", Supplier Unit Price 1=$0.05773
C35 C36: library part 0603C, "CAPACITOR 0603 CERAMIC  9p 50V", Capacitance=9pF, Case Code (Imperial)=0603, Case Code (Metric)=1608, Dielectric=C0G, Manufacturer=TDK, Manufacturer Part Number=CGA3E2NP01H090D080AA, Ratings=AEC-Q200, Resistor Type=Ceramic, Supplier Part Number 1=445-12433-1-ND, Category="Ceramic Capacitors", Features="High Temperature", Supplier 1=Digi-Key, Supplier Unit Price 1=$0.20
J1 J2 J3: "Socket Strip, Cuttable, Double Row, 0.050\"x0.050\" Pitch", Manufacturer=SAMTEC, CREATED="JUNE 03,  2014 - WENDY XIN", PCB DECAL=SFMC-104-X1-XX-D, System=Connector
L1: library part L-1608, "FIXED IND 1.5UH 625MA 150 MOHM", Case Code (Metric)=1608, Current Rating=625mA, Manufacturer=TDK, Supplier Part Number 1=445-6152-1-ND, Tolerance=20%, Category="Fixed Inductors", Composition=Wirewound, Manufacturer Part Number=GLFR1608T1R5M-LR, Shielding=Shielded, Supplier 1=Digi-Key, Supplier Unit Price 1=$0.10971, Termination=SMD/SMT
L2: library part Inductor, "FERRITE BEAD 30 OHM 0603 1LN", Case Code (Metric)=1608, Manufacturer=TDK, Manufacturer Part Number=MPZ1608S300ATAH0, Supplier Part Number 1=445-1562-1-ND, Test Frequency=100MHz, Tolerance=25%, Category="Ferrite Beads and Chips", Impedance=30R, Supplier 1=Digi-Key
LED1: library part LED-1608, "LED RED CLEAR 2SMD 1.95V, 5mA", Case/Package=0603, Forward Voltage=2.2V, Manufacturer=Everlight, Manufacturer Part Number=19-217/R6C-AL1M2VY/3T, Supplier Part Number 1=1080-1585-1-ND, ComponentLink1Description=https://media.digikey.com/pdf/Data%20Sheets/Everlight%20PDFs/19-217-R6C-AL1M2VY-3T.pdf?src-supplier=Digi-Key, ComponentLink1URL=https://media.digikey.com/pdf/Data%20Sheets/Everlight%20PDFs/19-217-R6C-AL1M2VY-3T.pdf?src-supplier=Digi-Key, Supplier 1=Digi-Key
P1: "CONN HDR 6POS 0.05 STACK T/H Dual row", Manufacturer=Samtec, Manufacturer Part Number=FW-03-04-L-D-200-100, Mount=TH, Supplier 1=Samtec, Supplier Part Number 1=FW-03-04-L-D-200-100, System=Connector
P2: "CONN HDR 4POS 0.05 STACK T/H Dual row", Manufacturer=Samtec, Manufacturer Part Number=FW-02-04-L-D-200-100, Mount=TH, Supplier 1=Samtec, Supplier Part Number 1=FW-02-04-L-D-200-100, System=Connector
P3: "CONN MAGJACK 1PORT 100 BASE-T", Supplier Part Number 1=1278-1011-ND, Temperature="0°C to +70°C", Temperature Range High=+70°C, Temperature Range Low=0°C, ComponentLink1Description=Upverter, ComponentLink1URL=https://upverter.com/upn/revision/a90ddcab053b3c09/, ComponentLink2Description=Datasheet, ComponentLink2URL=http://www.shopwiznet.com/lanotattachments/download/file/id/95/store/1/, RoHS=TRUE, Supplier 1=Digi-Key, Supplier 2=Mouser, Supplier Part Number 2=950-RB1-125BAG1A
P4: "Connector Header Through Hole 4 position 0.098\" (2.50mm)", Manufacturer=Molex, Manufacturer Part Number=207843-0004, Supplier Part Number 1=900-2078430004-ND, Supplier 1=Digi-Key, Supplier Packaging 1=Tray, Supplier Unit Price 1=$0.43
Q1: "MOSFET N-CH 60V 115MA SOT23-3", Manufacturer_Name="Diodes Inc.", Manufacturer_Part_Number=DMN65D8L-7, Mouser Part Number=621-DMN65D8L-7, Supplier Part Number 1=2N7002E-T1-E3CT-ND, Datasheet Link=https://www.diodes.com/assets/Datasheets/DMN65D8L.pdf, Height=1mm, Supplier 1=Digi-Key
R1: library part R-1608, "0 Ohms Jumper 0.1W, 1/10W Chip Resistor 0603 (1608 Metric) Moisture Resistant Thick Film", Case Code (Metric)=1608, Manufacturer=Yageo, Manufacturer Part Number=RC0603JR-070RL, Power Rating=100mW, Supplier Part Number 1=311-0.0GRDKR-ND, Temperature Coefficient=200ppm/°C, Tolerance=1%, Voltage Rating=50V, Category="Chip SMD Resistors", Composition="Thick Film", Supplier 1=Digi-Key, Supplier Unit Price 1=$0.00347
R2: library part "22K Ohm 0.5% 1/16W 0603", "RES SMD 22K OHM 0.5% 1/16W 0603", Case Code (Metric)=1608, Manufacturer=Susumu, Manufacturer Part Number=RR0816P-223-D, Max Power Dissipation=63mW, Power Rating=62.5mW, Resistance=22kR, Supplier Part Number 1=RR08P22.0KDCT-ND, Temperature Coefficient=25ppm/°C, Tolerance=0.5%, Voltage Rating=75V, Category="Chip SMD Resistors", Supplier 1=Digi-Key, Supplier Unit Price 1=$0.01237
R3: "Gen Purp Chip, R0603 0.1W 5%", Case Code (Metric)=1608, Manufacturer="TE Connectivity", Manufacturer Part Number=CRGCQ0603J330R, Max Power Dissipation=100mW, PartNumber=ERJ3GEYJ101V, Supplier Part Number 1=A130088CT-ND, Temperature Coefficient=100ppm/°C, Voltage=75, ComponentLink1Description=https://www.te.com/commerce/DocumentDelivery/DDEController?Action=srchrtrv&amp;DocNm=1773204-3&amp;DocType=DS&amp;DocLang=English&src-supplier=Digi-Key, ComponentLink1URL=https://www.te.com/commerce/DocumentDelivery/DDEController?Action=srchrtrv&amp;DocNm=1773204-3&amp;DocType=DS&amp;DocLang=English&src-supplier=Digi-Key, Component SubKind=Resistor, Component Type=Standard, Composition="Thick Film", Material=Thick-Film, MetricFootprint=R1608MM, Pin Count=2, Published=7/16/2009, Publisher=AltiumDBManager1.1, Resistance=330R, RoHS=Yes, Supplier 1=Digi-Key, Watts=0.1W
R4 R6: library part RES1, "RES SMD 100K OHM 1% 1/4W 0603", Case Code (Metric)=1608, Manufacturer="Vishay Dale", Manufacturer Part Number=RCA0603100KFKEAHP, Max Power Dissipation=250mW, Resistance=100kR, Supplier Part Number 1=541-3247-1-ND, Temperature Coefficient=100ppm/°C, Tolerance=1%, ComponentLink1Description=http://www.vishay.com/docs/20067/rcahp.pdf?src-supplier=Digi-Key, ComponentLink1URL=http://www.vishay.com/docs/20067/rcahp.pdf?src-supplier=Digi-Key, Composition="Thick Film", Supplier 1=Digi-Key, Supplier Unit Price 1=$0.03376
R5: library part RES1, "RES SMD 402K OHM 1% 1/10W 0603", Case Code (Metric)=1608, Manufacturer=Yageo, Manufacturer Part Number=RC0603FR-07402KL, Max Power Dissipation=100mW, Resistance=402kR, Resistor Type="Thick Film", Supplier Part Number 1=311-402KHRCT-ND, Temperature Coefficient=100ppm/°C, Tolerance=1%, Voltage Rating (DC)=50V, Category="Chip SMD Resistors", Size Code=0603, Supplier 1=Digi-Key, Supplier Unit Price 1=$0.10
R7 R8 R9 R10 R11 R12 R13 R14 R15 R16 R17 R21 R27: library part RES1, "RES SMD 10K OHM 0.5% 1/16W 0603", Case Code (Metric)=1608, Manufacturer=Susumu, Manufacturer Part Number=RR0816P-103-D, Max Power Dissipation=63mW, Resistance=10kR, Supplier Part Number 1=RR08P10.0KDCT-ND, Tolerance=0.5%, Category="Chip SMD Resistors", Supplier 1=Digi-Key, Supplier Unit Price 1=$0.0136, Termination=SMD/SMT
R18 R19 R24 R25: library part R-1608, "RES SMD 49.9 OHM 1% 1/10W 0603", Case Code (Metric)=1608, Manufacturer=Yageo, Manufacturer Part Number=RC0603FR-0749R9L, Power Rating=100mW, Resistance=49.9R, Supplier Part Number 1=311-49.9HRDKR-ND, Temperature Coefficient=100ppm/°C, Tolerance=1%, Voltage Rating=50V, Category="Chip SMD Resistors", Supplier 1=Digi-Key, Supplier Unit Price 1=$0.00366
R20: library part R-1608, "RES SMD 10 OHM 1% 1/10W 0603", Case Code (Metric)=1608, Manufacturer=Yageo, Manufacturer Part Number=RC0603FR-0710RL, Resistance=10R, Supplier Part Number 1=311-10.0HRCT-ND, Temperature Coefficient=200ppm/°C, Tolerance=1%, Category="Chip SMD Resistors", Supplier 1=Digi-Key, Supplier Unit Price 1=$0.00729
R22: library part R-1608, "Resistor CRGCQ 0603 1M0 5%", Case Code (Metric)=1608, Manufacturer="TE Connectivity", Manufacturer Part Number=CRGCQ0603J1M0, Max Power Dissipation=100mW, Resistance=1MR, Supplier Part Number 1=A130109CT-ND, Temperature Coefficient=100ppm/°C, Tolerance=5%, Composition="Thick Film", Supplier 1=Digi-Key, Supplier Unit Price 1=$0.00336
R23: library part R-1608, "RESISTOR 0603 12.4K 1%", Supplier Part Number 1=P12.4KHCT-ND, Supplier 1=Digi-Key
R26 R28: library part R-1608, "330 Ohms ±5% 0.1W, 1/10W Chip Resistor 0603", Case Code (Metric)=1608, Manufacturer="TE Connectivity", Manufacturer Part Number=CRGCQ0603J330R, Max Power Dissipation=100mW, Supplier Part Number 1=A130088CT-ND, Tolerance=5%, Composition="Thick Film", Supplier 1=Digi-Key, Supplier Unit Price 1=$0.00336
R29: "220 Ohms ±1% 0.1W, 1/10W Chip Resistor 0603 (1608 Metric) Moisture Resistant Thick Film", Case Code (Metric)=1608, Manufacturer=Yageo, Manufacturer Part Number=RC0603FR-07220RL, Max Power Dissipation=100mW, Supplier Part Number 1=311-220HRCT-ND, Tolerance=1%, Voltage Rating=50V, Category="Chip SMD Resistors", Supplier 1=Digi-Key, Supplier Unit Price 1=$0.00366
R32 R33: library part RES1, "RES SMD 100K OHM 1% 1/4W 0603", Case Code (Metric)=1608, Manufacturer="Vishay Dale", Manufacturer Part Number=RCA0603100KFKEAHP, Max Power Dissipation=250mW, Resistance=100kR, Supplier Part Number 1=541-3247-1-ND, Tolerance=1%, Supplier 1=Digi-Key, Supplier Unit Price 1=$0.03376
R34: library part "100 Ohm 5% 1/10W 0603", "RES 100 OHM 5% 1/10W 0603", Case Code (Metric)=1608, Manufacturer="Stackpole Electronics", Manufacturer Part Number=RMCF0603JT100R, Supplier Part Number 1=RMCF0603JT100RCT-ND, Temperature Coefficient=100ppm/°C, Tolerance=5%, Features="Automotive AEC-Q200", Resistance=100R, Supplier 1=Digi-Key, Supplier Unit Price 1=$0.00207
R35: library part "4K7 Ohm 5% 1/10W 0603", "RES 4.7K OHM 5% 1/10W 0603", Case Code (Imperial)=0603, Manufacturer="Stackpole Electronics", Manufacturer Part Number=RMCF0603JT4K70, Max Power Dissipation=100mW, Supplier Part Number 1=RMCF0603JT4K70CT-ND, Temperature Coefficient=200ppm/°C, Category="Chip SMD Resistors", Features="Automotive AEC-Q200", Supplier 1=Digi-Key, Supplier Unit Price 1=$0.00207
SWD1: "CONN RCPT MICRO USB AB R/A SMD", Contact Resistance=40mR, Current Rating=1.8A, Manufacturer=Molex, Manufacturer Part Number=47589-0001, Supplier Part Number 1=WM17143CT-ND, Category="USB Connectors", ComponentLink1Description=https://datasheet.ciiva.com/16148/0475890001-io-connectors-16148921.pdf?src-supplier=Onlinecomponents.com, ComponentLink1URL=https://datasheet.ciiva.com/16148/0475890001-io-connectors-16148921.pdf?src-supplier=Onlinecomponents.com, Gender=Female, Mount="Surface Mount,PCB", Number of Contacts=5, Orientation="Right Angle", Supplier 1=Digi-Key, Supplier Unit Price 1=$0.48114
U1: library part MCP1700T-3302E/TT, "Voltage Regulator; LDO; SOT-23; PD 369.6mW; VO 3.3V; Regline +/-0.75%/V", Manufacturer=Microchip, Supplier Part Number 1=MCP1700T3302ETTCT-ND, Category="Voltage Regulators - Linear", ComponentLink1Description=https://datasheet.ciiva.com/2040/21826b-2040112.pdf?src-supplier=Digi-Key, ComponentLink1URL=https://datasheet.ciiva.com/2040/21826b-2040112.pdf?src-supplier=Digi-Key, Manufacturer Part Number=MCP1700T-3302E/TT, Supplier 1=Digi-Key, Supplier Unit Price 1=$0.28
U2: library part RT9025-25GSP, "High performance 2A ULDO linear regulator", Case/Package=SOIC, Dropout Voltage=230mV, Manufacturer=Richtek, Max Input Voltage=5V, Max Output Current=2A, Supplier Part Number 1=1028-1009-2-ND, Category="Voltage Regulators - Linear", Manufacturer Part Number=RT9025-25GSP, Output Current=2A, Supplier 1=Digi-Key, Supplier Unit Price 1=$0.33814
U3: "Ethernet Controller 10/100 Base-T/TX PHY SPI Interface", Case/Package=LQFP, Manufacturer=WIZnet, Max Supply Current=132mA, Max Supply Voltage=3.63V, Min Supply Voltage=2.97V, Supplier Part Number 1=1278-1021-ND, Category="Integrated Circuits (ICs)", DeviceSetName=W5500, Interface=SPI, LibraryName=WIZnet, Manufacturer Part Number=W5500, Supplier 1=Digi-Key, SymbolName_1=W5500
U4: library part STM32L152RCT6, "IC MCU 32BIT 512KB FLASH 64LQFP", Case/Package=LQFP, Frequency=32MHz, Manufacturer=STMicroelectronics, Max Supply Voltage=3.6V, Min Supply Voltage=1.8V, Supplier Part Number 1=497-17527-ND, Category=Microcontrollers, Core Architecture=ARM, Manufacturer Part Number=STM32L151RET6, Memory Size=512KB, RAM Size=80KB, Supplier 1=Digi-Key